# Altium PCB PCB-Oil Diffuser.PcbDoc (part 2 of 2)
Units mil, origin at the board's own origin, x right, y up, seen from the top; angles counter-clockwise.
Board outline 3000 x 3000 mil, 2 copper layers (Top Layer, Bottom Layer), stack 61.811 mil thick; 42 components, 28 nets, 129 pads, 48 vias.
Unrouted connection lines stored in the file: 7.
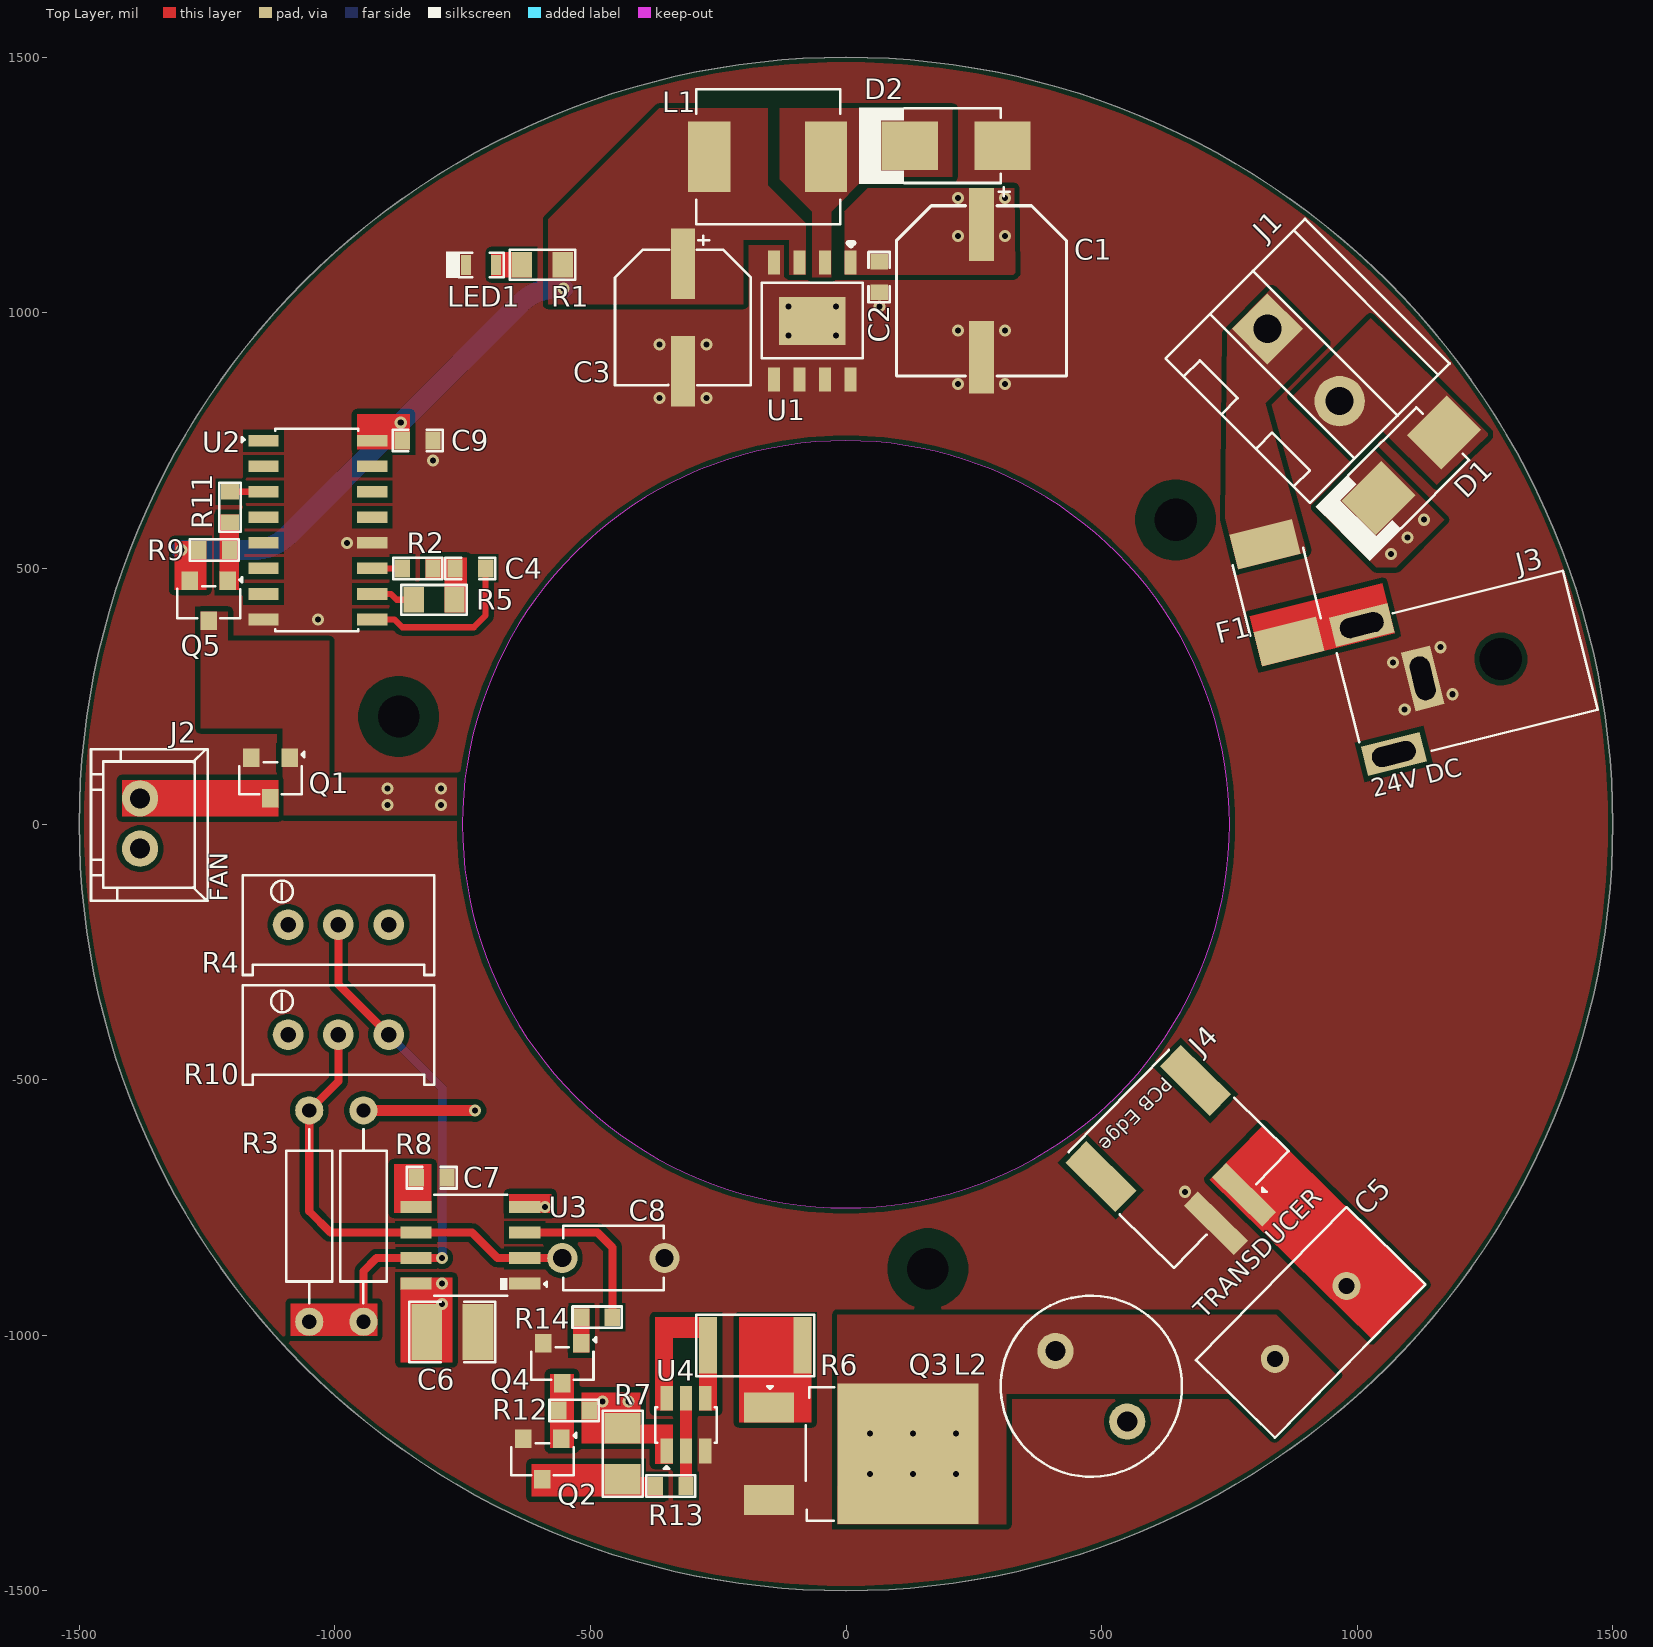
[diagram p0: Top Layer view]

## Other copper (continued)
Top Layer: (continued)
  region net NetF1_1: 1049.18,471.64 789.16,406.81 813.89,307.65 1073.9,372.47
  rectangle net NetJ2_1: -1416.43,14.82 -1109.86,85.68
  rectangle net +12: -1314,457.89 -1251,553.5
  rectangle net NetQ5_1: -1225.34,457.89 -1187.5,605
  rectangle net NetC4_1: -785.87,413.58 -741.87,521
  rectangle net NetC4_1: -823,479 -741.87,521
  rectangle net NetQ2_3: -615.26,-1316 -402,-1252
  rectangle net NetQ2_3: -476,-1316 -358,-1277.5
  rectangle net +12VD: -373.68,-1252 -338.2,-1182
  rectangle net +12VD: -425.75,-1212 -338.2,-1175
  rectangle net +12VD: -517,-1212 -402,-1112.48
  rectangle net NetQ2_1: -578.66,-1220.74 -532,-1076.26
  rectangle net "G_Drive IN": -325.2,-1312.5 -300.8,-1099.41
  region net NetR6_2: -338.2,-964.88 -373.68,-964.88 -373.68,-1147.44 -338.2,-1147.44
  rectangle net NetR6_2: -287.8,-1147.44 -252.32,-964.88
  rectangle net MG1: -209,-1170.98 -67.28,-964.88
  region net PIEZO+: 1133.43,-901.09 815.75,-588.92 710.73,-695.79 1028.4,-1007.97
  rectangle net NetLED1_1: -694.1,1069 -614,1119
  pour cut-out: -29.19,1198 -29.19,1064.89 -1.04,1064.89 -1.04,1198
  pour cut-out: -292.18,1437 -292.18,1400 -11.17,1400 -11.17,1437
Bottom Layer:
  rectangle net NetC5_2: -16.8,-1295 251,-1164.9
Multi-Layer:
  pour cut-out: 81.26,-870 ccw(c160,-870) 160,-948.74 ccw(c160,-870) 238.74,-870 ccw(c160,-870) 160,-791.26 ccw(c160,-870)
  pour cut-out: -953.74,210 ccw(c-875,210) -875,131.26 ccw(c-875,210) -796.26,210 ccw(c-875,210) -875,288.74 ccw(c-875,210)
  pour cut-out: 566.26,595 ccw(c645,595) 645,516.26 ccw(c645,595) 723.74,595 ccw(c645,595) 645,673.74 ccw(c645,595)

## Silkscreen, mask and mechanical layers (free items; w line width, h text height)
Top Overlay:
  text "24V DC" at 1034.87,40.82 h60 r14
  text "FAN" at -1198,-151.75 h60 r90
  text "TRANSDUCER" at 709.59,-977.8 h60 r45.5
Dimension:
  circle w10: c645,595 r78.74
  circle w10: c160,-870 r78.74
  circle w10: c-875,210 r78.74
  lines w5: -0.15,-751.2 0,-751.05 0,0 ; 530.48,-531.4 0,0 ; 751.05,0 0,0
  lines w10: 0,-750.42 ccw(c0,0) 750.42,0
Board Outline:
  circle w10: c0.02,0 r1500
  circle w10: c0,0 r750.42
Fabrication:
  drawing of 191 lines, arcs and shapes, not listed
  text "Layer" at 1690.34,937 h60
  text "Name" at 2100.26,937 h60
  text "Material" at 3030,937 h60
  text "Thickness" at 3889.77,937 h60
  text "Constant" at 4539.6,937 h60
  text "Board Layer Stack" at 5109.46,937 h60
  text "Top Overlay" at 2100.26,817 h60
  text "Top Solder" at 2100.26,697 h60
  text "Solder Resist" at 3030,697 h60
  text "0.010mm" at 3889.77,697 h60
  text "3.5" at 4539.6,697 h60
  text "1" at 1690.34,577 h60
  text "Top Layer" at 2100.26,577 h60
  text "0.035mm" at 3889.77,577 h60
  text "Dielectric 1" at 2100.26,457 h60
  text "FR-4" at 3030,457 h60
  text "1.500mm" at 3889.77,457 h60
  text "4.8" at 4539.6,457 h60
  text "2" at 1690.34,337 h60
  text "Bottom Layer" at 2100.26,337 h60
  text "0.035mm" at 3889.77,337 h60
  text "Bottom Solder" at 2100.26,217 h60
  text "Solder Resist" at 3030,217 h60
  text "0.010mm" at 3889.77,217 h60
  text "3.5" at 4539.6,217 h60
  text "Bottom Overlay" at 2100.26,97 h60
  text "Total board thickness:" at 1690.34,-23 h60
  text "1.590mm" at 3889.77,-23 h60
Drill Drawing:
  circle w10: c1719.62,2378.27 r20
  circle w10: c1719.62,2378.27 r33.33
  circle w10: c1719.62,1928.27 r33.33
  lines w10: 1686.29,1611.61 1702.96,1611.61 1719.62,1594.94 1736.29,1611.61 1752.96,1611.61 1736.29,1628.27 1752.96,1644.94 1736.29,1644.94 1719.62,1661.61 1702.96,1644.94 1686.29,1644.94 1702.96,1628.27 1686.29,1611.61 ; 1686.29,1744.94 1719.62,1761.61 1752.96,1744.94 1736.29,1778.27 1752.96,1811.61 1719.62,1794.94 1686.29,1811.61 1702.96,1778.27 1686.29,1744.94 ; 1686.29,2061.61 1702.96,2061.61 1719.62,2044.94 1736.29,2061.61 1752.96,2061.61 1736.29,2078.27 1752.96,2094.94 1736.29,2094.94 1719.62,2111.61 1702.96,2094.94 1686.29,2094.94 1702.96,2078.27 1686.29,2061.61 ; 1686.29,2261.61 1752.96,2261.61 1719.62,2194.94 1686.29,2261.61 ; 1686.29,2494.94 1752.96,2494.94 1752.96,2561.61 1686.29,2561.61 1686.29,2494.94 ; 1686.29,2661.61 1702.96,2661.61 1702.96,2644.94 1736.29,2644.94 1736.29,2661.61 1752.96,2661.61 1752.96,2694.94 1736.29,2694.94 1736.29,2711.61 1702.96,2711.61 1702.96,2694.94 1686.29,2694.94 1686.29,2661.61 ; 1686.29,2794.94 1686.29,2811.61 1702.96,2828.27 1686.29,2844.94 1686.29,2861.61 1702.96,2861.61 1719.62,2844.94 1736.29,2861.61 1752.96,2861.61 1752.96,2844.94 1736.29,2828.27 1752.96,2811.61 1752.96,2794.94 1736.29,2794.94 1719.62,2811.61 1702.96,2794.94 1686.29,2794.94 ; 1686.29,2961.61 1702.96,2961.61 1702.96,2944.94 1736.29,2944.94 1736.29,2961.61 1752.96,2961.61 1752.96,2994.94 1736.29,2994.94 1736.29,3011.61 1702.96,3011.61 1702.96,2994.94 1686.29,2994.94 1686.29,2961.61 ; 1686.29,3094.94 1752.96,3094.94 1752.96,3161.61 1686.29,3161.61 1686.29,3094.94 ; 1699.62,1758.27 1719.62,1768.27 1739.62,1758.27 1729.62,1778.27 1739.62,1798.27 1719.62,1788.27 1699.62,1798.27 1709.62,1778.27 1699.62,1758.27 ; 1699.62,2068.27 1709.62,2068.27 1719.62,2058.27 1729.62,2068.27 1739.62,2068.27 1729.62,2078.27 1739.62,2088.27 1729.62,2088.27 1719.62,2098.27 1709.62,2088.27 1699.62,2088.27 1709.62,2078.27 1699.62,2068.27 ; 1699.62,2668.27 1709.62,2668.27 1709.62,2658.27 1729.62,2658.27 1729.62,2668.27 1739.62,2668.27 1739.62,2688.27 1729.62,2688.27 1729.62,2698.27 1709.62,2698.27 1709.62,2688.27 1699.62,2688.27 1699.62,2668.27 ; 1699.62,3108.27 1739.62,3108.27 1739.62,3148.27 1699.62,3148.27 1699.62,3108.27
  lines w15: 1626.5,1549.94 15394.61,1549.94 ; 1626.5,3199.94 15394.61,3199.94 ; 2177.38,1399.94 2177.38,3349.94 ; 2717.24,1399.94 2717.24,3349.94 ; 3816.92,1399.94 3816.92,3349.94 ; 4322.79,1399.94 4322.79,3349.94 ; 5056.59,1399.94 5056.59,3349.94 ; 6556.14,1399.94 6556.14,3349.94 ; 7145.99,1399.94 7145.99,3349.94 ; 7891.79,1399.94 7891.79,3349.94 ; 9381.34,1399.94 9381.34,3349.94 ; 10235.11,1399.94 10235.11,3349.94 ; 11568.72,1399.94 11568.72,3349.94 ; 12902.32,1399.94 12902.32,3349.94 ; 13992.01,1399.94 13992.01,3349.94 ; 1626.5,1399.94 15394.61,1399.94 15394.61,3349.94 1626.5,3349.94 1626.5,1399.94
  text "Symbol" at 1716.5,3244.94 h72
  text "Count" at 2222.38,3244.94 h72
  text "Hole Size" at 2762.24,3244.94 h72
  text "Plated" at 3861.92,3244.94 h72
  text "Hole Type" at 4367.79,3244.94 h72
  text "Drill Layer Pair" at 5101.59,3244.94 h72
  text "Via/Pad" at 6601.14,3244.94 h72
  text "Pad Shape" at 7190.99,3244.94 h72
  text "Template" at 7936.79,3244.94 h72
  text "Description" at 9426.34,3244.94 h72
  text "Hole Tolerance (+)" at 10280.11,3244.94 h72
  text "Hole Tolerance (-)" at 11613.72,3244.94 h72
  text "Hole Length" at 12947.32,3244.94 h72
  text "Routed Path Length" at 14037.01,3244.94 h72
  text "1" at 2222.38,3094.94 h60
  text "82.67mil (2.100mm)" at 2762.24,3094.94 h60
  text "NPTH" at 3861.92,3094.94 h60
  text "Round" at 4367.79,3094.94 h60
  text "Top Layer - Bottom Layer" at 5101.59,3094.94 h60
  text "Pad" at 6601.14,3094.94 h60
  text "Rounded" at 7190.99,3094.94 h60
  text "c0hn210" at 7936.79,3094.94 h60
  text "-" at 12947.32,3094.94 h60
  text "-" at 14037.01,3094.94 h60
  text "1" at 2222.38,2944.94 h60
  text "82.68mil (2.100mm)" at 2762.24,2944.94 h60
  text "NPTH" at 3861.92,2944.94 h60
  text "Round" at 4367.79,2944.94 h60
  text "Top Layer - Bottom Layer" at 5101.59,2944.94 h60
  text "Pad" at 6601.14,2944.94 h60
  text "Rounded" at 7190.99,2944.94 h60
  text "c0hn210m5" at 7936.79,2944.94 h60
  text "-" at 12947.32,2944.94 h60
  text "-" at 14037.01,2944.94 h60
  text "2" at 2222.38,2794.94 h60
  text "31.50mil (0.800mm)" at 2762.24,2794.94 h60
  text "PTH" at 3861.92,2794.94 h60
  text "Round" at 4367.79,2794.94 h60
  text "Top Layer - Bottom Layer" at 5101.59,2794.94 h60
  text "Pad" at 6601.14,2794.94 h60
  text "Rounded" at 7190.99,2794.94 h60
  text "c140h80o0_0m145mx145p140" at 7936.79,2794.94 h60
  text "-" at 12947.32,2794.94 h60
  text "-" at 14037.01,2794.94 h60
  text "2" at 2222.38,2644.94 h60
  text "35.43mil (0.900mm)" at 2762.24,2644.94 h60
  text "PTH" at 3861.92,2644.94 h60
  text "Round" at 4367.79,2644.94 h60
  text "Top Layer - Bottom Layer" at 5101.59,2644.94 h60
  text "Pad" at 6601.14,2644.94 h60
  text "Rounded" at 7190.99,2644.94 h60
  text "c150h90m155mx155p150" at 7936.79,2644.94 h60
  text "-" at 12947.32,2644.94 h60
  text "-" at 14037.01,2644.94 h60
  text "2" at 2222.38,2494.94 h60
  text "55.12mil (1.400mm)" at 2762.24,2494.94 h60
  text "PTH" at 3861.92,2494.94 h60
  text "Round" at 4367.79,2494.94 h60
  text "Top Layer - Bottom Layer" at 5101.59,2494.94 h60
  text "Pad" at 6601.14,2494.94 h60
  text "(Mixed)" at 7190.99,2494.94 h60
  text "(Mixed)" at 7936.79,2494.94 h60
  text "-" at 12947.32,2494.94 h60
  text "-" at 14037.01,2494.94 h60
  text "2" at 2222.38,2344.94 h60
  text "82.00mil (2.083mm)" at 2762.24,2344.94 h60
  text "NPTH" at 3861.92,2344.94 h60
  text "Round" at 4367.79,2344.94 h60
  text "Top Layer - Bottom Layer" at 5101.59,2344.94 h60
  text "Pad" at 6601.14,2344.94 h60
  text "Rounded" at 7190.99,2344.94 h60
  text "c0hn208" at 7936.79,2344.94 h60
  text "-" at 12947.32,2344.94 h60
  text "-" at 14037.01,2344.94 h60
  text "3" at 2222.38,2194.94 h60
  text "39.37mil (1.000mm)" at 2762.24,2194.94 h60
  text "PTH" at 3861.92,2194.94 h60
  text "Slot" at 4367.79,2194.94 h60
  text "Top Layer - Bottom Layer" at 5101.59,2194.94 h60
  text "Pad" at 6601.14,2194.94 h60
  text "Rectangle" at 7190.99,2194.94 h60
  text "(Mixed)" at 7936.79,2194.94 h60
  text "86.61mil (2.200mm)" at 12947.32,2194.94 h60
  text "47.24mil (1.200mm)" at 14037.01,2194.94 h60
  text "4" at 2222.38,2044.94 h60
  text "27.56mil (0.700mm)" at 2762.24,2044.94 h60
  text "PTH" at 3861.92,2044.94 h60
  text "Round" at 4367.79,2044.94 h60
  text "Top Layer - Bottom Layer" at 5101.59,2044.94 h60
  text "Pad" at 6601.14,2044.94 h60
  text "Rounded" at 7190.99,2044.94 h60
  text "c140h70m145mx145p140" at 7936.79,2044.94 h60
  text "-" at 12947.32,2044.94 h60
  text "-" at 14037.01,2044.94 h60
  text "4" at 2222.38,1894.94 h60
  text "39.37mil (1.000mm)" at 2762.24,1894.94 h60
  text "PTH" at 3861.92,1894.94 h60
  text "Round" at 4367.79,1894.94 h60
  text "Top Layer - Bottom Layer" at 5101.59,1894.94 h60
  text "Pad" at 6601.14,1894.94 h60
  text "Rounded" at 7190.99,1894.94 h60
  text "(Mixed)" at 7936.79,1894.94 h60
  text "-" at 12947.32,1894.94 h60
  text "-" at 14037.01,1894.94 h60
  text "6" at 2222.38,1744.94 h60
  text "30.00mil (0.762mm)" at 2762.24,1744.94 h60
  text "PTH" at 3861.92,1744.94 h60
  text "Round" at 4367.79,1744.94 h60
  text "Top Layer - Bottom Layer" at 5101.59,1744.94 h60
  text "Pad" at 6601.14,1744.94 h60
  text "Rounded" at 7190.99,1744.94 h60
  text "c152h76m157mx157p152" at 7936.79,1744.94 h60
  text "-" at 12947.32,1744.94 h60
  text "-" at 14037.01,1744.94 h60
  text "48" at 2222.38,1594.94 h60
  text "11.81mil (0.300mm)" at 2762.24,1594.94 h60
  text "PTH" at 3861.92,1594.94 h60
  text "Round" at 4367.79,1594.94 h60
  text "Top Layer - Bottom Layer" at 5101.59,1594.94 h60
  text "Via" at 6601.14,1594.94 h60
  text "Rounded" at 7190.99,1594.94 h60
  text "v60h30m0mx0" at 7936.79,1594.94 h60
  text "-" at 12947.32,1594.94 h60
  text "-" at 14037.01,1594.94 h60
  text "75 Total" at 2222.38,1444.94 h60
  text "Slot definitions :" at 1716.5,1299.97 h60
  text "Routed Path Length" at 2749.19,1299.97 h60
  text "= Calculated from tool start centre position to tool end centre position." at 3851.86,1299.97 h60
  text "Hole Length" at 2749.19,1199.99 h60
  text "= Routed Path Length + Tool Size = Slot length as defined in the PCB layout" at 3441.99,1199.99 h60

## Dimensions
-750.42,0 to 750.42,0 on Dimension
-1500,0 to 1500.02,0 on Dimension

## Text inside footprints (layer, text, board x,y; h text height)
J4: Top Overlay "PCB Edge" at 614.96,-485.92 h47.24 r225.5